# Altium PCB Transmitter_PCB_v1.0.PcbDoc
Units mil, origin at the board's own origin, x right, y up, seen from the top; angles counter-clockwise.
Board outline 1225 x 1773.54 mil, 2 copper layers (Top Layer, Bottom Layer), stack 57 mil thick; 26 components, 18 nets, 66 pads, 142 vias.
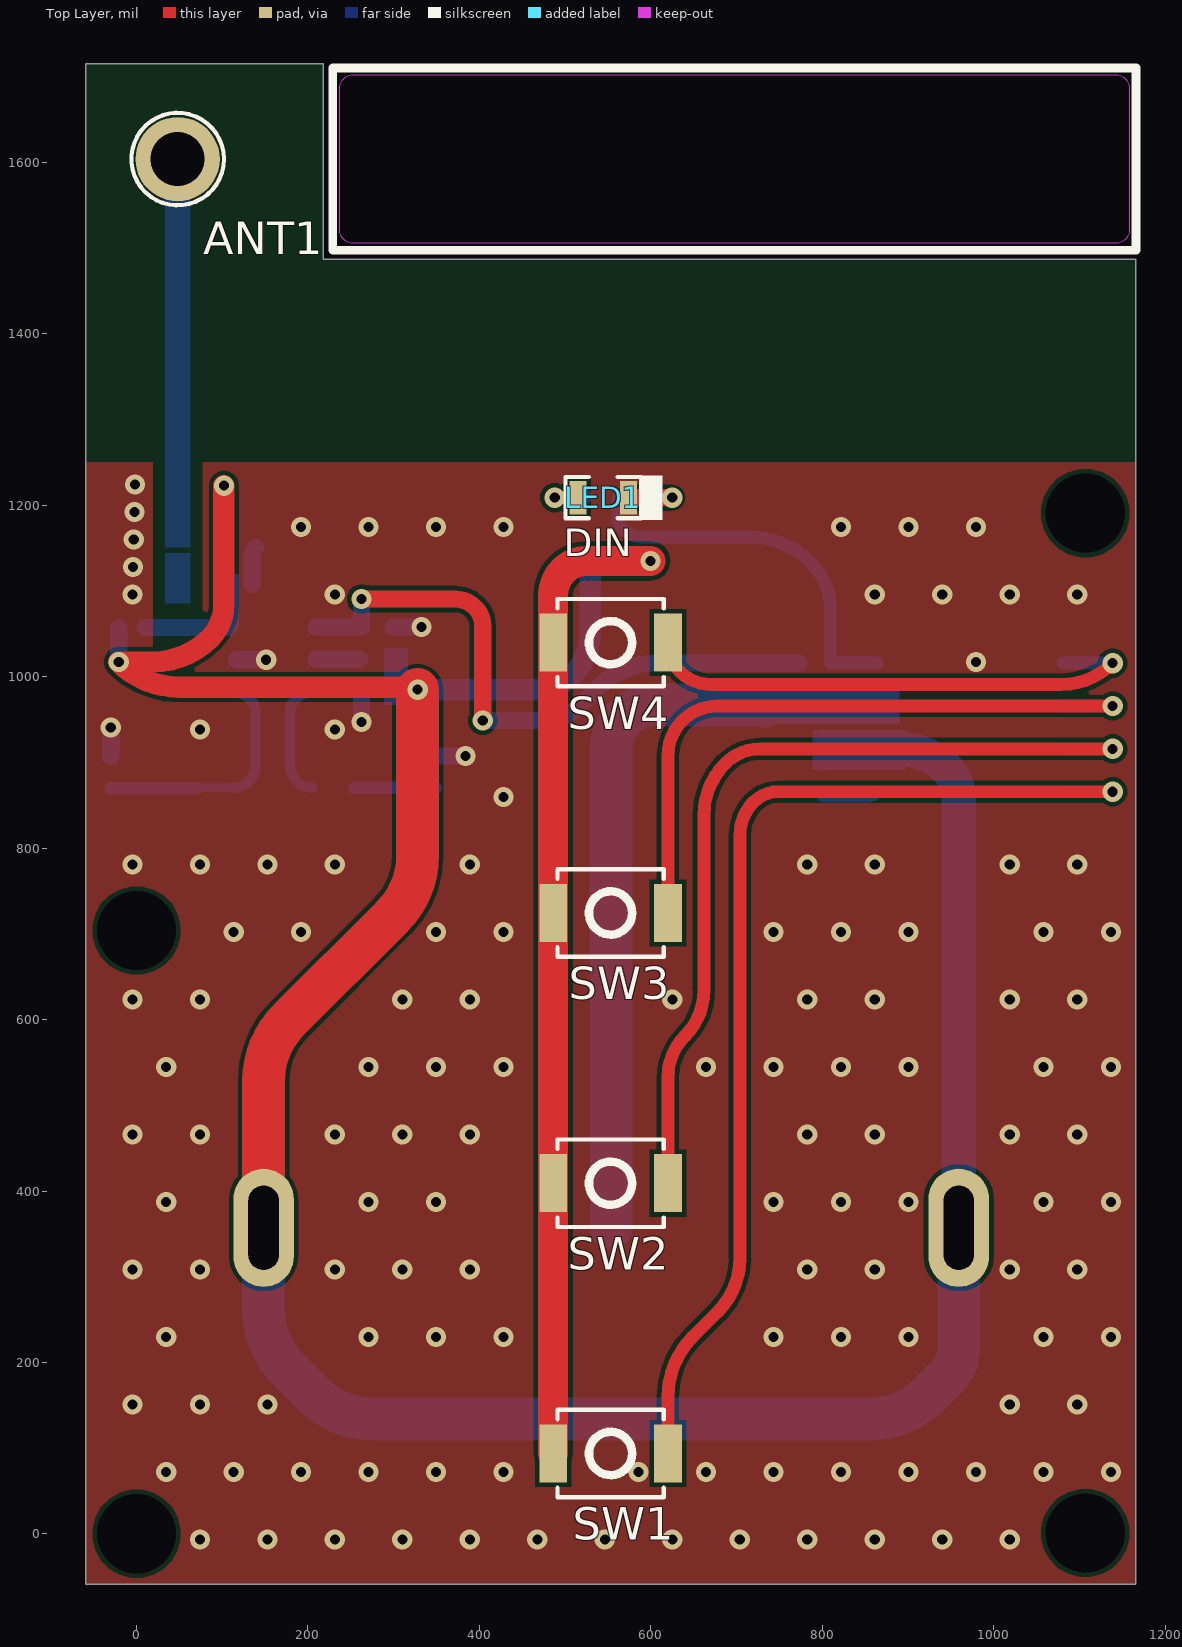
[diagram p0: Top Layer view]
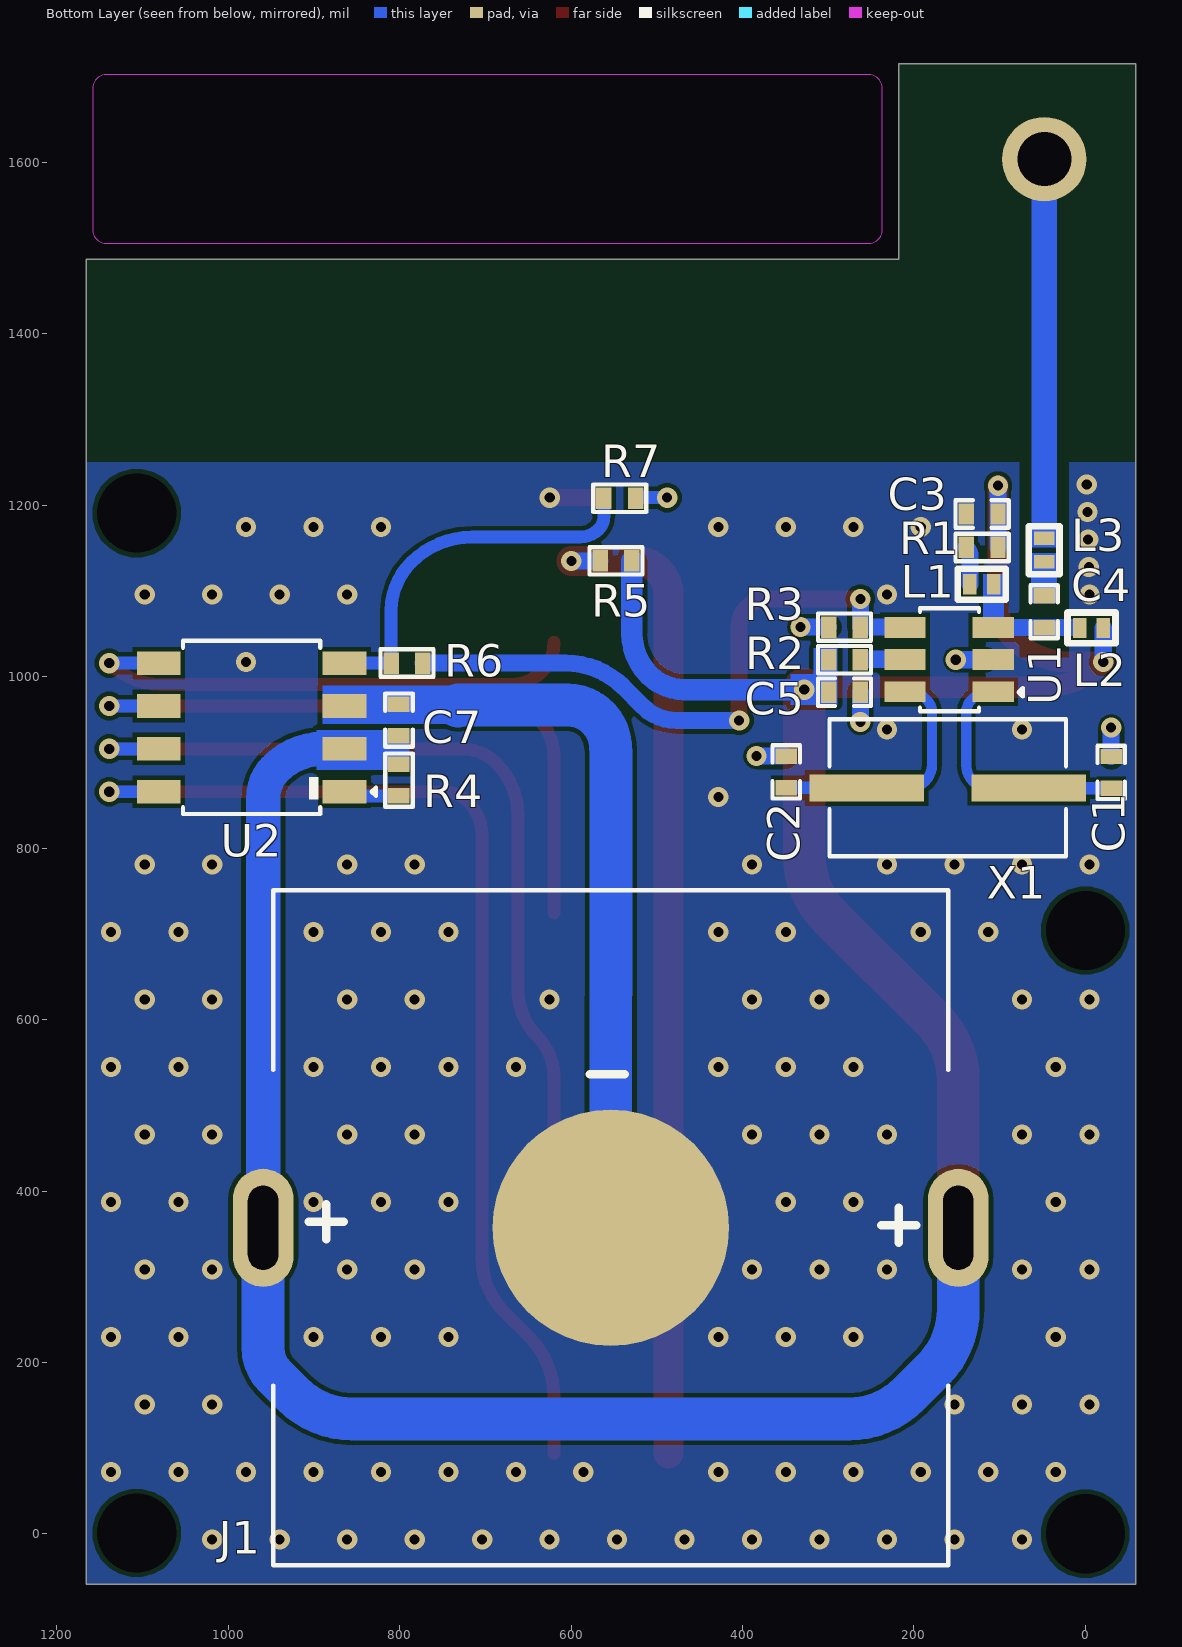
[diagram p1: Bottom Layer view, seen from below]
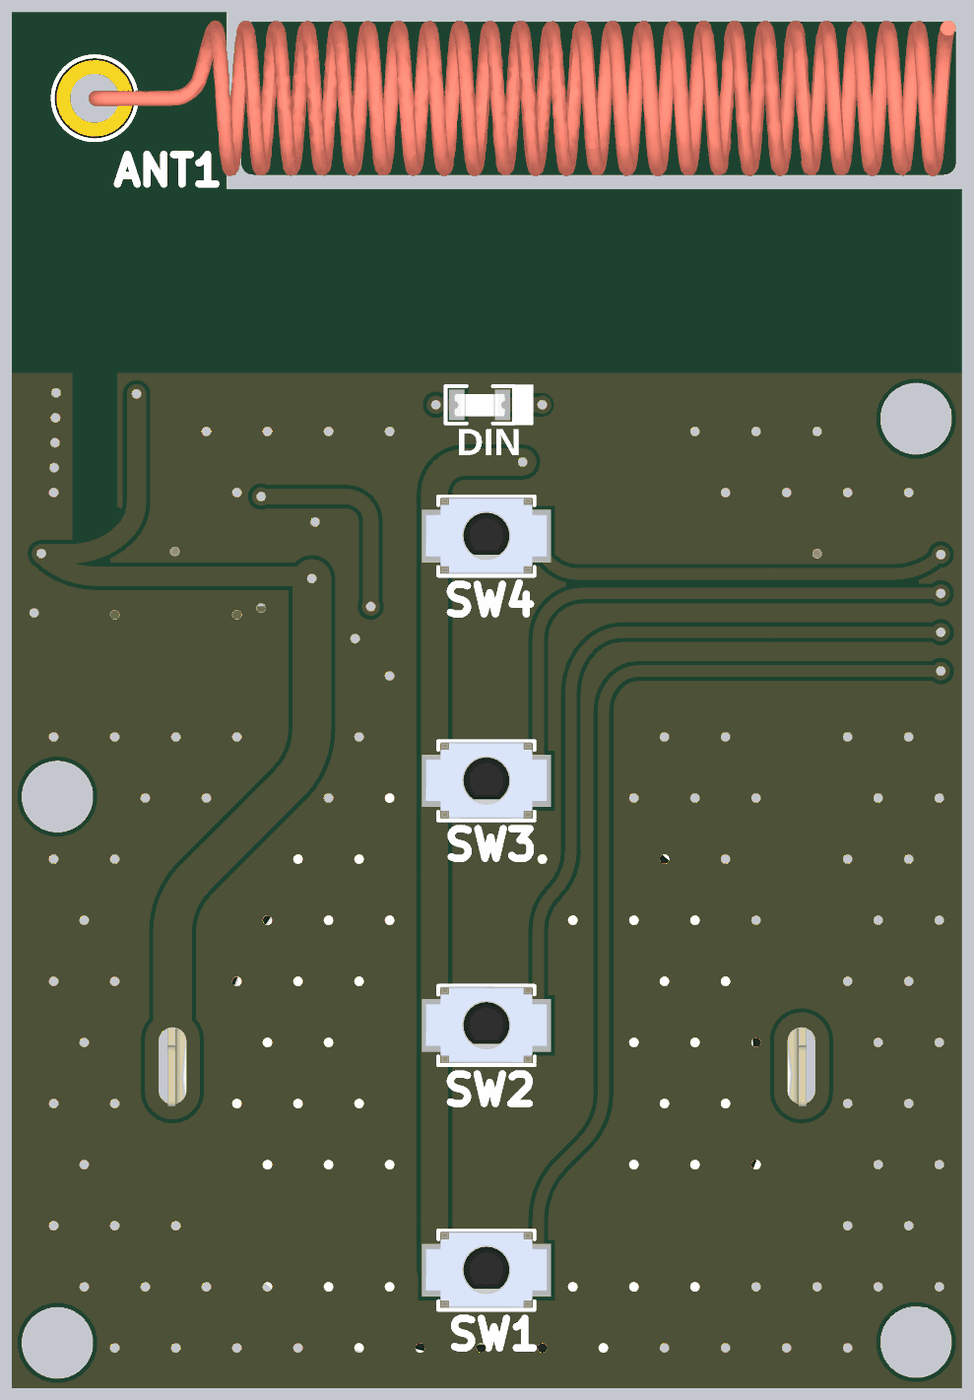
[diagram p2: 3D render of the assembled board from above, using the file's embedded part models]
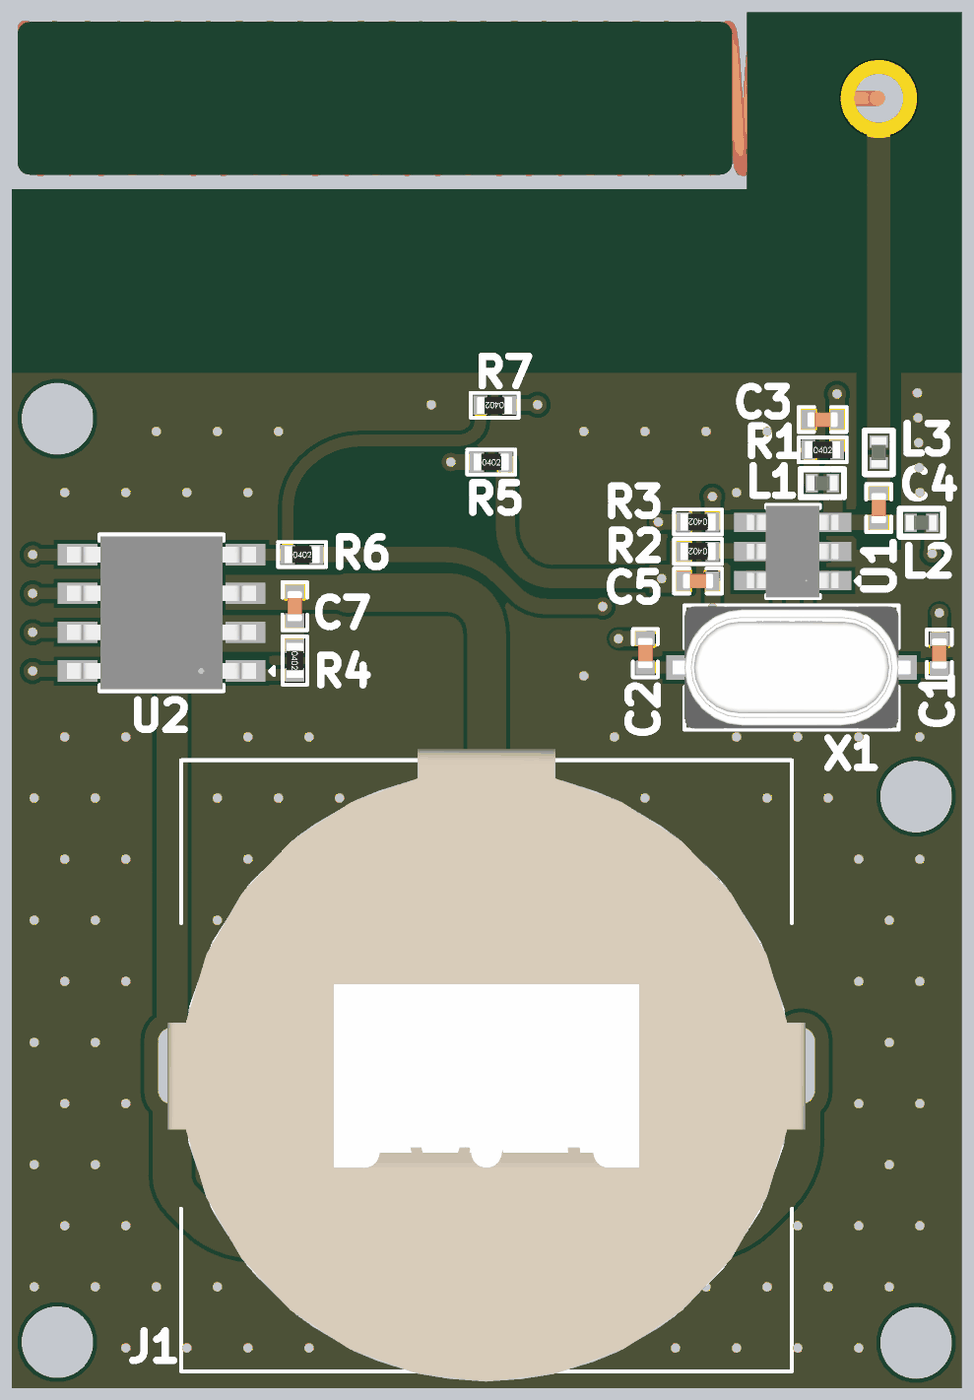
[diagram p3: 3D render of the assembled board from below, using the file's embedded part models]

## Layer stack, top to bottom
Top Solder: solder mask 3, Solder Resist, Dk 3.5
Top Layer: signal copper 10
Dielectric 1: core 37, FR-4, Dk 4.8
Bottom Layer: signal copper 10
Bottom Solder: solder mask 3, Solder Resist, Dk 3.5

## Board outline
-59,-58.54 -59,1715 218,1715 218,1487 1166,1487 1166,1486.73 1166,-58.54

## Design rules (kind name [scope] priority, off if disabled: settings)
Clearance [All] p1: gap=5 ignorepadtopadclearanceinfootprint=FALSE
HoleSize [All] p1: absolutevalues=TRUE maxlimit=1000 minlimit=1 maxpercent=80.000 minpercent=20.000
HoleToHoleClearance [All] p1: gap=0 allowstackedmicrovias=TRUE
MinimumSolderMaskSliver [All] p1: minsoldermaskwidth=0
PolygonConnect [All] p1: connectstyle=Direct reliefconductorwidth=10 reliefentries=4 polygonreliefangle="90 Angle" airgapwidth=10
RoutingVias [All] p1: holewidth=11.81 width=23.62 viastyle="Through Hole" minholewidth=11.81 minwidth=23.62 maxholewidth=11.81 maxwidth=23.62
SilkToSilkClearance [All] p1: silktosilkclearance=0
SilkToSolderMaskClearance [IsPad] p1: minsilkscreentomaskgap=0 clearancetoexposedcopper=TRUE
SolderMaskExpansion [All] p1: expansion=4 istentingtop=TRUE soldermaskfromhole=TRUE
Width [All] p1: maxlimit=100 minlimit=10 preferedwidth=15 minimp=50.000000 maximp=50.000000 favimp=50.000000
25 further rules are at their usual default settings.

## Components (designator, comment, footprint, x,y, rotation, side; value= is the part's Value field where it differs from the comment)
ANT1 "T14-433M" T14-433M 48,1604 r90 top locked
C1 "18pF" Cap-0402 -30,888.5 r90 bottom locked
C2 "18pF" Cap-0402 349,889 r90 bottom locked
C3 "1uF" Cap-0402 120.47,1189.94 r180 bottom locked
C4 "12pF" Cap-0402 48.13,1075.87 r270 bottom locked
C5 "2.2uf" Cap-0402 281.07,981.93 r0 bottom locked
C7 "100pF" Cap-0402 800.91,949.5 r270 bottom locked
J1 "MY-2032-02" MY-2032-02 553.82,357.13 r180 bottom locked
L1 "180nH" IND-0402 120.97,1107.94 r0 bottom locked
L2 "120nH" IND-0402 -7,1057 r180 bottom locked
L3 "56nH" IND-0402 48.13,1147.7 r270 bottom locked
LED1 "RED" LED-0603 544.47,1209 r0 top locked
R1 "0R" Res-0402 120.47,1150.94 r180 bottom locked
R2 "0R" Res-0402 281.07,1019.93 r0 bottom locked
R3 "DNP" Res-0402 281.07,1057.93 r0 bottom locked
R4 "300K" Res-0402 800.91,879.5 r270 bottom locked
R5 "1K" Res-0402 547.71,1135.21 r180 bottom locked
R6 "10K" Res-0402 791.5,1016 r180 bottom locked
R7 "3.3K" Res-0402 543.29,1208.33 r0 bottom locked
SW1 "B3U-1000P" B3U-1000P 553.07,93.79 r180 top locked
SW2 "B3U-1000P" B3U-1000P 553.07,409.12 r180 top locked
SW3 "B3U-1000P" B3U-1000P 553.07,724.45 r180 top locked
SW4 "B3U-1000P" B3U-1000P 553.07,1039.78 r180 top locked
U1 "WF4455TD AS6T LG" SOT-23-6 159.07,1019.93 r0 bottom locked
U2 "L1527" SOP-8 972.89,940.9 r0 bottom locked
X1 "13.56MHz" HC-49S-SMD-2P-Mini 160.54,870.45 r0 bottom locked

## Footprints (in the part's own frame and the unit in brackets; to place one, negate y for a bottom-side part, rotate by r counter-clockwise, add the part's x,y. Pads: shape width x height; smd on the part's side, far side on the other; paste and mask are expansions set on the pad)
B3U-1000P [mm] "SWITCH TACTILE SPST-NO 0.05A 12V"
  rect 0.82x1.72 smd: 1(-1.7,0) 2(1.7,0)
  silkscreen extent -1.57,-1.3 1.57,1.3, body extent -2,-1.26 2,1.24, height 1.6
Cap-0402 [mil]
  rect 18x25 smd mask+2.36: 1(-18.5,0) 2(18.5,0)
  silkscreen extent -31,-16 31,16, body extent -20,-10 20,10, height 19
HC-49S-SMD-2P-Mini [mm]
  rect 3.4x0.8 smd: 1(-2.4,0) 2(2.4,0)
  silkscreen extent -3.51,-2.03 3.51,2.03, body extent -3.9,-2 3.9,2, height 2.35
IND-0402 [mm]
  rect 0.4x0.6 smd: 1(-0.35,0) 2(0.35,0)
  silkscreen extent -0.71,-0.46 0.71,0.46, body extent -0.5,-0.25 0.5,0.25, height 0.25
LED-0603 [mm]
  rect 0.5x1 smd: 1(-0.75,0) 2(0.75,0)
  silkscreen extent -1.12,-0.66 1.75,0.66, body extent -0.82,-0.37 0.82,0.36, height 0.68
MY-2032-02 [mm]
  oval 1.8x3.5 hole 0.9 slot 2.5 at 90 deg: 1(-10.3,0) 1(10.3,0)
  round 7 smd: 2(0,0)
  silkscreen extent -10,-10 10,10, body extent -10.45,-10.34 10.45,10.36, height 4.14
Res-0402 [mil]
  rect 18x25 smd mask+2.17: 1(-18.5,0) 2(18.5,0)
  silkscreen extent -32,-17 32,16, body extent -23,-11 23,11, height 16
SOP-8 [mm]
  rect 1.3x0.7 smd: 1(-2.75,1.905) 2(-2.75,0.635) 3(-2.75,-0.635) 4(-2.75,-1.905) 5(2.75,-1.905) 6(2.75,-0.635) 7(2.75,0.635) 8(2.75,1.905)
  silkscreen extent -3.69,-2.57 2.03,2.57, body extent -3.1,-2.5 3.1,2.5, height 1.76
SOT-23-6 [mm]
  rect 1.22x0.62 smd: 1(-1.31,0.95) 2(-1.31,0) 3(-1.31,-0.95) 4(1.31,-0.95) 5(1.31,0) 6(1.31,0.95)
  silkscreen extent -2.18,-1.52 0.86,1.52, body extent -1.5,-1.5 1.5,1.5, height 1.47
T14-433M [mm]
  round 2.5 hole 1.6 paste+0 mask+0.051: 1(0,0)
  Keep-Out Layer board cut-out: -2.1,-4.8 2.1,-4.8 2.253,-4.83 2.383,-4.917 2.47,-5.047 2.5,-5.2 2.5,-5.2 2.5,-27.8 2.47,-27.953 2.383,-28.083 2.253,-28.169 2.1,-28.2 2.1,-28.2 -2.1,-28.2 -2.253,-28.169 -2.383,-28.083 -2.47,-27.953 -2.5,-27.8 -2.5,-27.8 -2.5,-5.2 -2.47,-5.047 -2.383,-4.917 -2.253,-4.83 -2.1,-4.8
  silkscreen extent -2.7,-28.4 2.7,1.37, body extent -2.55,-28.2 2.55,0.2, height 6.65

## Part data
ANT1: "433MHz helical Antennas ROHS", LCSC Part Number=C381188, Manufacturer=DreamLNK, ComponentLink1Description=LCSC, ComponentLink1URL=https://www.lcsc.com/product-detail/Antennas_DreamLNK-T14-433M_C381188.html, Item Type=Antenna, Manufacturer Part Number=T14-433M
C1 C2: library part GCM1555C1H180GA16D, "CAP CER 18PF 50V C0G/NP0 0402", Case Code (Imperial)=0402, Case Code (Metric)=1005, LCSC Part Number=C882583, Manufacturer=Murata, Max Operating Temperature=125°C, Min Operating Temperature=-55°C, Ratings=AEC-Q200, Supplier Part Number=2477793P, Tolerance=2%, Voltage Rating=50V, Case/Package=0402, Category="Ceramic Capacitors", ComponentLink1Description=http://search.murata.co.jp/Ceramy/image/img/A01X/G101/ENG/GCM1555C1H180GA16-01.pdf?src-supplier=Digi-Key, ComponentLink1URL=http://search.murata.co.jp/Ceramy/image/img/A01X/G101/ENG/GCM1555C1H180GA16-01.pdf?src-supplier=Digi-Key, ComponentLink2Description=https://search.murata.co.jp/Ceramy/image/img/A01X/G101/ENG/GCM1555C1H180GA16-01.pdf?src-supplier=Digi-Key, ComponentLink2URL=https://search.murata.co.jp/Ceramy/image/img/A01X/G101/ENG/GCM1555C1H180GA16-01.pdf?src-supplier=Digi-Key, ComponentLink3Description=https://datasheet.octopart.com/GCM1555C1H180GA16D-Murata-datasheet-149522315.pdf?src-supplier=Newark, ComponentLink3URL=https://datasheet.octopart.com/GCM1555C1H180GA16D-Murata-datasheet-149522315.pdf?src-supplier=Newark, ComponentLink4Description=https://datasheet.octopart.com/GCM1555C1H180GA16D-Murata-datasheet-12511495.pdf?src-supplier=TME, ComponentLink4URL=https://datasheet.octopart.com/GCM1555C1H180GA16D-Murata-datasheet-12511495.pdf?src-supplier=TME, Item Type=Capacitor, Manufacturer Part Number=GCM1555C1H180GA16D, Mounting Technology="Surface Mount", Packaging="Cut Tape", Pricing="500=0.013, 5000=0.009 (GBP)", RoHS=Yes, RoHS Compliant=Yes, Series=GCM, Stock=10000, Supplier=Rs
C3: library part CC0402KRX5R8BB105, "CAP CER 1UF 25V X5R 0402", Case Code (Imperial)=0402, Case Code (Metric)=1005, Dielectric=X5R, LCSC Part Number=C326568, Manufacturer=Yageo, Max Operating Temperature=85°C, Min Operating Temperature=-55°C, Package Quantity=10000, Supplier Part Number 1=603-CC402KRX5R8BB105, Tolerance=10%, Voltage Rating=25V, Capacitance=1uF, Case/Package=0402, Category="Ceramic Capacitors", ComponentLink1Description=http://www.mouser.com/ds/2/447/Yageo_UPY-GP_NP0_16V-to-50V_9-358835.pdf?src-supplier=Mouser, ComponentLink1URL=http://www.mouser.com/ds/2/447/Yageo_UPY-GP_NP0_16V-to-50V_9-358835.pdf?src-supplier=Mouser, ComponentLink2Description=http://www.yageo.com/documents/recent/UPY-GPHC_X5R_4V-to-50V_25.pdf?src-supplier=Digi-Key, ComponentLink2URL=http://www.yageo.com/documents/recent/UPY-GPHC_X5R_4V-to-50V_25.pdf?src-supplier=Digi-Key, ComponentLink3Description=https://4donline.ihs.com/images/VipMasterIC/IC/YAGO/YAGO-S-A0006851646/YAGO-S-A0006851646-1.pdf?hkey=6D3A4C79FDBF58556ACFDE234799DDF0&src-supplier=Newark, ComponentLink3URL=https://4donline.ihs.com/images/VipMasterIC/IC/YAGO/YAGO-S-A0006851646/YAGO-S-A0006851646-1.pdf?hkey=6D3A4C79FDBF58556ACFDE234799DDF0&src-supplier=Newark, Halogen Free="Halogen Free", Lead Free="Lead Free", Length=0.039inch, Manufacturer Part Number=CC0402KRX5R8BB105, Mount="Surface Mount", Packaging="Tape and Reel", Pricing 1="1=0.30000, 10=0.20400, 50=0.20400, 100=0.11600, 1000=0.07200, 10000=0.05900 (USD)", RoHS=Yes, RoHS Compliant=Yes, Stock 1=91975, Supplier 1=Mouser, Termination=SMD/SMT, Thickness=0.022inch, Voltage Rating (DC)=25V, Weight=2.3E-05oz, Width=0.02inch
C4: library part GJM1555C1H120GB01D, "CAP CER 12PF 50V C0G/NP0 0402", Case Code (Imperial)=0402, Case Code (Metric)=1005, Dielectric=C0G, LCSC Part Number=C161305, Manufacturer=Murata, Max Operating Temperature=125°C, Min Operating Temperature=-55°C, Package Quantity=10000, Supplier Part Number 1=490-8078-1-ND, Tolerance=2%, Voltage Rating=50V, Capacitance=12pF, Case/Package=0402, Category="Ceramic Capacitors", ComponentLink1Description=https://datasheet.ciiva.com/11608/product-11608208.pdf?src-supplier=Avnet, ComponentLink1URL=https://datasheet.ciiva.com/11608/product-11608208.pdf?src-supplier=Avnet, ComponentLink2Description=https://datasheet.ciiva.com/29542/partnumbering-e-01-29542716.pdf?src-supplier=Digi-Key, ComponentLink2URL=https://datasheet.ciiva.com/29542/partnumbering-e-01-29542716.pdf?src-supplier=Digi-Key, ComponentLink3Description=https://datasheet.ciiva.com/29542/partnumbering-e-01-29542715.pdf?src-supplier=Digi-Key, ComponentLink3URL=https://datasheet.ciiva.com/29542/partnumbering-e-01-29542715.pdf?src-supplier=Digi-Key, ComponentLink4Description=https://datasheet.ciiva.com/29542/partnumbering-e-01-29542717.pdf?src-supplier=Digi-Key, ComponentLink4URL=https://datasheet.ciiva.com/29542/partnumbering-e-01-29542717.pdf?src-supplier=Digi-Key, Construction=Flat, Depth=0.5mm, Height=0.5mm, Lead Free="Lead Free", Length=1mm, Manufacturer Part Number=GJM1555C1H120GB01D, Mount="Surface Mount", Packaging="Tape and Reel", Pricing 1="1=0.18000, 10=0.12600, 50=0.07560, 100=0.06390, 500=0.04370, 1000=0.03865, 2500=0.03698, 5000=0.03361 (USD)", Radiation Hardening=No, RoHS=Yes, RoHS Compliant=Yes, Series=GJM, Stock 1=266975, Supplier 1=Digi-Key, Termination=SMD/SMT, Thickness=0.022inch, Voltage Rating (DC)=50V, Width=0.5mm
C5: library part GRM155R61E225KE11D, "CAP CER 2.2UF 25V X5R 0402", Capacitance=2.2uF, Case Code (Imperial)=0402, Case Code (Metric)=1005, Dielectric=X5R, LCSC Part Number=C385032, Manufacturer=Murata, Max Operating Temperature=85°C, Min Operating Temperature=-55°C, Package Quantity=10000, Resistor Type=Ceramic, Tolerance=10%, Voltage Rating=25V, Case/Package=0402, Category="Ceramic Capacitors", ComponentLink1Description=http://www.mouser.com/ds/2/281/c02e-2905.pdf?src-supplier=Mouser, ComponentLink1URL=http://www.mouser.com/ds/2/281/c02e-2905.pdf?src-supplier=Mouser, ComponentLink2Description=http://search.murata.co.jp/Ceramy/image/img/A01X/G101/ENG/GRM155R61E225KE11-01.pdf?src-supplier=Digi-Key, ComponentLink2URL=http://search.murata.co.jp/Ceramy/image/img/A01X/G101/ENG/GRM155R61E225KE11-01.pdf?src-supplier=Digi-Key, ComponentLink3Description=http://search.murata.co.jp/Ceramy/image/img/A01X/partnumbering_e_01.pdf?src-supplier=Digi-Key, ComponentLink3URL=http://search.murata.co.jp/Ceramy/image/img/A01X/partnumbering_e_01.pdf?src-supplier=Digi-Key, ComponentLink4Description=http://psearch.en.murata.com/capacitor/product/GRM155R61E225KE11%23.pdf?src-supplier=Avnet, ComponentLink4URL=http://psearch.en.murata.com/capacitor/product/GRM155R61E225KE11%23.pdf?src-supplier=Avnet, Height=0.5mm, Item Type=Capacitor, Lead Free="Lead Free", Length=1mm, Manufacturer Part Number=GRM155R61E225KE11D, Material=Ceramic, Mount="Surface Mount", Packaging="Tape and Reel", Pricing 1="10000=0.03830, 20000=0.03623, 40000=0.03416, 60000=0.03209, 80000=0.03002, 100000=0.02795, 1000000=0.02588 (USD)", RoHS=Yes, RoHS Compliant=Yes, Stock 1=210000, Supplier 1=Avnet, Supplier Part Number 1=GRM155R61E225KE11D, Termination=SMD/SMT, Thickness=0.022inch, Voltage Rating (DC)=25V, Weight=0.000212oz, Width=0.5mm
C7: library part CC0402JRNPO9BN101, "CAP CER 100PF 50V C0G/NPO 0402", Case Code (Imperial)=0402, Case Code (Metric)=1005, Dielectric=C0G, Dielectric Material=Ceramic, Insulation Resistance=100GR, LCSC Part Number=C106200, Manufacturer=Yageo, Max Operating Temperature=125°C, Min Operating Temperature=-55°C, Package Quantity=1, Supplier Part Number=8934564, Temperature Coefficient=30ppm/°C, Tolerance=5%, Voltage=50V, Case/Package=0402, Category="Ceramic Capacitors", ComponentLink1Description=https://datasheet.ciiva.com/11786/0900766b80d84fbf-11786101.pdf?src-supplier=Rs, ComponentLink1URL=https://datasheet.ciiva.com/11786/0900766b80d84fbf-11786101.pdf?src-supplier=Rs, ComponentLink2Description=https://datasheet.ciiva.com/23767/25787-23767888.pdf?src-supplier=Newark, ComponentLink2URL=https://datasheet.ciiva.com/23767/25787-23767888.pdf?src-supplier=Newark, ComponentLink3Description=https://datasheet.ciiva.com/28450/1443161-28450220.pdf?src-supplier=Element14, ComponentLink3URL=https://datasheet.ciiva.com/28450/1443161-28450220.pdf?src-supplier=Element14, ComponentLink4Description=https://datasheet.ciiva.com/8033/1443161-8033598.pdf?src-supplier=Element14, ComponentLink4URL=https://datasheet.ciiva.com/8033/1443161-8033598.pdf?src-supplier=Element14, ComponentLink5Description=https://datasheet.ciiva.com/143/mlccorderingcode-143990.pdf?src-supplier=Digi-Key, ComponentLink5URL=https://datasheet.ciiva.com/143/mlccorderingcode-143990.pdf?src-supplier=Digi-Key, ComponentLink6Description=https://datasheet.ciiva.com/143/mlccorderingcode-143989.pdf?src-supplier=Digi-Key, ComponentLink6URL=https://datasheet.ciiva.com/143/mlccorderingcode-143989.pdf?src-supplier=Digi-Key, ComponentLink7Description=https://datasheet.ciiva.com/143/mlccorderingcode-143991.pdf?src-supplier=Digi-Key, ComponentLink7URL=https://datasheet.ciiva.com/143/mlccorderingcode-143991.pdf?src-supplier=Digi-Key, Depth=0.5mm, Height=0.5mm, Item Type=Capacitor, Lead Free="Lead Free", Length=1mm, Manufacturer Part Number=CC0402JRNPO9BN101, Mounting Technology="Surface Mount", Packaging="Tape and Reel", Pins=2, Pricing="10000=0.002, 40000=0.0019, 150000=0.0018, 400000=0.0018, 1000000=0.0017 (USD)", Radiation Hardening=No, Reach SVHC Compliant=No, RoHS=Yes, RoHS Compliant=Yes, Series=CC, Stock=11720000, Supplier="Future Electronics", Termination=SMD/SMT, Thickness=0.022inch, Voltage Rating=50V, Voltage Rating (DC)=50V, Width=0.02inch
J1: "Battery button CR2032 Plugin Battery Connectors ROHS", LCSC Part Number=C964822, Manufacturer=MYOUNG, Package=Plugin, ComponentLink1Description=LCSC, ComponentLink1URL=https://www.lcsc.com/product-detail/Battery-Connectors_MYOUNG-MY-2032-02_C964822.html, Item Type="Battery Connector", Manufacturer Part Number=MY-2032-02
L1: library part LQG15HSR18J02D, "FIXED IND 180NH 150MA 3.38OHM SM", Case Code (Imperial)=0402, Case Code (Metric)=1005, Current Rating=130mA, DC Resistance (DCR)=3.38R, LCSC Part Number=C185484, Manufacturer=Murata, Max Operating Temperature=125°C, Min Operating Temperature=-55°C, Package Quantity=1, Self Resonant Frequency=500MHz, Supplier Part Number=6065630, Test Frequency=100MHz, Tolerance=5%, Case/Package=0402, Category="Fixed Inductors", ComponentLink1Description=https://datasheet.ciiva.com/11799/0900766b8090d458-11799084.pdf?src-supplier=Rs, ComponentLink1URL=https://datasheet.ciiva.com/11799/0900766b8090d458-11799084.pdf?src-supplier=Rs, ComponentLink2Description=https://datasheet.ciiva.com/4976/o05e-4976364.pdf?src-supplier=Mouser, ComponentLink2URL=https://datasheet.ciiva.com/4976/o05e-4976364.pdf?src-supplier=Mouser, ComponentLink3Description=https://datasheet.ciiva.com/16456/l0075s0083lqg15hs-16456253.pdf?src-supplier=Future+Electronics, ComponentLink3URL=https://datasheet.ciiva.com/16456/l0075s0083lqg15hs-16456253.pdf?src-supplier=Future+Electronics, ComponentLink4Description=https://datasheet.ciiva.com/6690/l0075s0083lqg15hs-6690743.pdf?src-supplier=Digi-Key, ComponentLink4URL=https://datasheet.ciiva.com/6690/l0075s0083lqg15hs-6690743.pdf?src-supplier=Digi-Key, ComponentLink5Description=https://datasheet.ciiva.com/6690/l0075s0083lqg15hs-6690745.pdf?src-supplier=Digi-Key, ComponentLink5URL=https://datasheet.ciiva.com/6690/l0075s0083lqg15hs-6690745.pdf?src-supplier=Digi-Key, ComponentLink6Description=https://datasheet.ciiva.com/6690/l0075s0083lqg15hs-6690746.pdf?src-supplier=Digi-Key, ComponentLink6URL=https://datasheet.ciiva.com/6690/l0075s0083lqg15hs-6690746.pdf?src-supplier=Digi-Key, Core Material=Air, DC Current=130mA, Depth=0.55mm, Height=0.5mm, Height - Seated (Max)=0.022inch, Item Type=Inductor, Lead Free="Lead Free", Length=1mm, Manufacturer Part Number=LQG15HSR18J02D, Max Current Rating=130mA, Max DC Current=130mA, Military Standard=Not, Mounting Technology="Surface Mount", Packaging="Tape and Reel", Pricing="10000=0.0094, 30000=0.0091, 50000=0.0089, 150000=0.0086, 250000=0.0083 (USD)", Q Factor=8, RoHS=Yes, RoHS Compliant=Yes, Series=LQG15HS, Shielding=Unshielded, Stock=20000, Supplier="Future Electronics", Termination=SMD/SMT, Width=0.02inch
L2: library part FHW0402UCR12JST, "30mA 120nH ±5% 2.2Ω 0402 Inductors (SMD) ROHS", LCSC Part Number=C317977, Manufacturer=FH, Package=0402, ComponentLink1Description=LCSC, ComponentLink1URL=https://www.lcsc.com/product-detail/Inductors-SMD_KOHERelec-MDA1040-470M_C2847557.html, Item Type=Inductor, Manufacturer Part Number=FHW0402UCR12JST
L3: library part AHW1005C-56NJTF, "100mA 56nH ±5% 0.97Ω 0402 Inductors (SMD) ROHS", LCSC Part Number=C6807990, Manufacturer=APV, Package=0402, ComponentLink1Description=LCSC, ComponentLink1URL=https://www.lcsc.com/product-detail/Inductors-SMD_APV-AHW1005C-56NJTF_C6807990.html, Item Type=Inductor, Manufacturer Part Number=AHW1005C-56NJTF
LED1: library part NCD0603R3, "RED LED 0603 Light Emitting Diodes", LCSC Part Number=C3151730, Manufacturer="Foshan NationStar Optoelectronics", Package=0603, ComponentLink1Description=LCSC, ComponentLink1URL=https://www.lcsc.com/product-detail/Light-Emitting-Diodes-LED_Foshan-NationStar-Optoelectronics-NCD0603R3_C3151730.html, Item Type=LED, Manufacturer Part Number=NCD0603R3
R1 R2: library part AC0402FR-070RL, "Zero Ohm Resistor, Jumper, 0402 [1005 Metric], Thick Film, 63 mW, 1 A, Surface Mount", Case Code (Imperial)=0402, Case Code (Metric)=1005, LCSC Part no=C226739, Manufacturer=Yageo, Max Operating Temperature=155°C, Min Operating Temperature=-55°C, Power Rating=62.5mW, Supplier Part Number=13-AC0402FR-070RLDKR-ND, Temperature Coefficient=200ppm/°C, Tolerance=1%, Voltage Rating=50V, Case/Package=0402, Category="Chip SMD Resistors", ComponentLink1Description=https://datasheet.ciiva.com/12656/pyu-ac-51-rohs-l-2-12656734.pdf?src-supplier=Mouser, ComponentLink1URL=https://datasheet.ciiva.com/12656/pyu-ac-51-rohs-l-2-12656734.pdf?src-supplier=Mouser, ComponentLink2Description=LCSC, ComponentLink2URL=https://www.lcsc.com/product-detail/Chip-Resistor-Surface-Mount_YAGEO-AC0402FR-070RL_C226739.html, Height=370um, Item Type=Resistor, Manufacturer Part Number=AC0402FR-070RL, Packaging="Tape and Reel", Pricing="1=0.1, 10=0.017, 25=0.0132, 50=0.01, 100=0.0071, 250=0.00568, 500=0.00454, 1000=0.00335, 5000=0.0024 (USD)", RoHS=Yes, Series=AC, Stock=337140, Supplier=Digi-Key, Termination=SMD/SMT
R3: library part RC0402FR-07100KL, "RES 100K OHM 1% 1/16W 0402", Case Code (Imperial)=0402, Case Code (Metric)=1005, LCSC Part Number=C60491, Manufacturer=Yageo, Max Operating Temperature=155°C, Max Power Dissipation=63mW, Min Operating Temperature=-55°C, Package Quantity=1, Resistance=100kR, Resistance Tolerance=1%, Resistor Type="Thick Film", Supplier Part Number 1=603-RC0402FR-07100KL, Temperature Coefficient=100ppm/°C, Voltage Rating=50V, Case/Package=0402, Category="Chip SMD Resistors", ComponentLink1Description=https://datasheet.ciiva.com/11819/0900766b80c66297-11819452.pdf?src-supplier=RSComponents, ComponentLink1URL=https://datasheet.ciiva.com/11819/0900766b80c66297-11819452.pdf?src-supplier=RSComponents, ComponentLink2Description=https://datasheet.ciiva.com/22747/1018594-22747509.pdf?src-supplier=Element14, ComponentLink2URL=https://datasheet.ciiva.com/22747/1018594-22747509.pdf?src-supplier=Element14, ComponentLink3Description=https://datasheet.ciiva.com/2453/pyu-r-int-thick-7-2453362.pdf?src-supplier=Digi-Key, ComponentLink3URL=https://datasheet.ciiva.com/2453/pyu-r-int-thick-7-2453362.pdf?src-supplier=Digi-Key, ComponentLink4Description=https://datasheet.ciiva.com/2453/pyu-r-int-thick-7-2453363.pdf?src-supplier=Digi-Key, ComponentLink4URL=https://datasheet.ciiva.com/2453/pyu-r-int-thick-7-2453363.pdf?src-supplier=Digi-Key, ComponentLink5Description=https://datasheet.ciiva.com/2453/pyu-r-int-thick-7-2453361.pdf?src-supplier=Digi-Key, ComponentLink5URL=https://datasheet.ciiva.com/2453/pyu-r-int-thick-7-2453361.pdf?src-supplier=Digi-Key, ComponentLink6Description=https://datasheet.ciiva.com/12667/pyu-rc0402-51-rohs-l-6-r-12667930.pdf?src-supplier=Mouser, ComponentLink6URL=https://datasheet.ciiva.com/12667/pyu-rc0402-51-rohs-l-6-r-12667930.pdf?src-supplier=Mouser, ComponentLink7Description=https://datasheet.ciiva.com/15189/getdatasheetpartid-323696-15189334.pdf?src-supplier=Verical, ComponentLink7URL=https://datasheet.ciiva.com/15189/getdatasheetpartid-323696-15189334.pdf?src-supplier=Verical, Construction=Rectangular, Depth=0.5mm, Features="Moisture Resistant", Height=0.016inch, Item Type=Resistor, Lead Free="Lead Free", Length=0.039inch, Manufacturer Part Number=RC0402FR-07100KL, Military Standard=Not, Number of Terminations=2, Packaging="Tape and Reel", Power Rating=63mW, Pricing 1="1=0.10000, 10=0.01200, 50=0.01200, 100=0.00500, 1000=0.00300, 2500=0.00200, 10000=0.00100 (USD)", REACH SVHC="No SVHC", RoHS=Yes, RoHS Compliant=Yes, Series=RC, Stock 1=7759549, Supplier 1=Mouser, Technology="THICK FILM", Termination=SMD/SMT, Tolerance=1%, Width=0.02inch, Working Voltage=50V
R4: library part RCS0402300KFKED, "RES SMD 300K OHM 1% 1/5W 0402", Case/Package=0402, LCSC Part Number=C1881124, Manufacturer="Vishay Dale", Max Operating Temperature=155°C, Max Power Dissipation=200mW, Min Operating Temperature=-55°C, Package Quantity=10000, Resistance=300kR, Resistor Type="Thick Film", Supplier Part Number 1=541-RCS0402300KFKEDDKR-ND, Temperature Coefficient=100ppm/°C, Tolerance=1%, ComponentLink1Description=http://www.vishay.com/docs/20065/rcse3.pdf?src-supplier=Digi-Key, ComponentLink1URL=http://www.vishay.com/docs/20065/rcse3.pdf?src-supplier=Digi-Key, Features="Automotive AEC-Q200", Height=0.016inch, Length=0.039inch, Manufacturer Part Number=RCS0402300KFKED, Number of Terminations=2, Packaging="Tape and Reel", Pricing 1="1=0.12, 10=0.105, 100=0.0402, 1000=0.01771, 2500=0.0153, 5000=0.01368 (USD)", RoHS Compliant=Yes, Stock 1=9042, Supplier 1=Digi-Key, Width=0.02inch
R5: library part CRCW04021K00FKEDHP, "RES SMD 1K OHM 1% 1/5W 0402", Case Code (Imperial)=0402, Case Code (Metric)=1005, LCSC Part Number=C313354, Manufacturer="Vishay Dale", Max Operating Temperature=155°C, Max Power Dissipation=125mW, Min Operating Temperature=-55°C, Package Quantity=10, Resistance=1kR, Resistance Tolerance=1%, Resistor Type="Thick Film", Supplier Part Number 1=541-1.00KYCT-ND, Temperature Coefficient=100ppm/°C, Voltage Rating=50V, Case/Package=0402, ComponentLink1Description=http://www.farnell.com/datasheets/2339608.pdf?src-supplier=Element14, ComponentLink1URL=http://www.farnell.com/datasheets/2339608.pdf?src-supplier=Element14, ComponentLink2Description=http://www.vishay.com/docs/20043/crcwhpe3.pdf?src-supplier=Digi-Key, ComponentLink2URL=http://www.vishay.com/docs/20043/crcwhpe3.pdf?src-supplier=Digi-Key, ComponentLink3Description=http://www.mouser.com/ds/2/427/crcwhpe3-46056.pdf?src-supplier=Mouser, ComponentLink3URL=http://www.mouser.com/ds/2/427/crcwhpe3-46056.pdf?src-supplier=Mouser, ComponentLink4Description=http://www.vishay.com/docs/20043/crcwhpe3.pdf?src-supplier=Avnet, ComponentLink4URL=http://www.vishay.com/docs/20043/crcwhpe3.pdf?src-supplier=Avnet, ComponentLink5Description=http://www.vishay.com/docs/20043/crcwhpe3.pdf?src-supplier=Future+Electronics, ComponentLink5URL=http://www.vishay.com/docs/20043/crcwhpe3.pdf?src-supplier=Future+Electronics, Construction=Rectangular, Contact Plating=Tin, Depth=0.5mm, Features="Automotive AEC-Q200", Height=0.3mm, Lead Free="Lead Free", Length=1mm, Manufacturer Part Number=CRCW04021K00FKEDHP, Military Standard=Not, Mount="Surface Mount", Number of Pins=2, Number of Terminations=2, Packaging="Tape and Reel", Power Rating=125mW, Pricing 1="1=0.15, 10=0.132, 100=0.0506, 1000=0.02226, 2500=0.01923, 5000=0.0172 (USD)", Radiation Hardening=No, REACH SVHC=Unknown, RoHS Compliant=Yes, Series=CRCW-HP, Size Code=0402, Stock 1=315989, Supplier 1=Digi-Key, Technology="THICK FILM", Termination=SMD/SMT, Tolerance=1%, Voltage Rating (DC)=50V, Weight=2.3E-05oz, Width=0.5mm
R6: library part RT0402BRD0710KL, "RES SMD 10K OHM 0.1% 1/16W 0402", LCSC Part Number=C190095, Manufacturer=Yageo, Supplier Part Number=1236728, Category="Chip SMD Resistors", ComponentLink1Description=https://datasheet.ciiva.com/12836/pyu-rt-1-to-0-05-rohs-l-4-12836454.pdf?src-supplier=Mouser, ComponentLink1URL=https://datasheet.ciiva.com/12836/pyu-rt-1-to-0-05-rohs-l-4-12836454.pdf?src-supplier=Mouser, Item Type=Resistor, Manufacturer Part Number=RT0402BRD0710KL, Pricing="10000=0.0218, 20000=0.0213, 30000=0.021, 50000=0.0206, 100000=0.0199 (USD)", RoHS=Yes, Stock=490000, Supplier="Future Electronics"
R7: library part RC0402FR-073K3L, "RES 3.3K OHM 1% 1/16W 0402", Case Code (Imperial)=0402, Case Code (Metric)=1005, LCSC Part Number=C137992, Manufacturer=Yageo, Max Operating Temperature=155°C, Max Power Dissipation=63mW, Min Operating Temperature=-55°C, Package Quantity=1, Power Rating=62.5mW, Resistance=3.3kR, Resistance Tolerance=1%, Resistor Type="Thick Film", Supplier Part Number 1=603-RC0402FR-073K3L, Temperature Coefficient=100ppm/°C, Voltage Rating=50V, Case/Package=0402, Category="Chip SMD Resistors", ComponentLink1Description=https://datasheet.ciiva.com/11808/0900766b80c66297-11808441.pdf?src-supplier=RSComponents, ComponentLink1URL=https://datasheet.ciiva.com/11808/0900766b80c66297-11808441.pdf?src-supplier=RSComponents, ComponentLink2Description=https://datasheet.ciiva.com/46394/1018594-46394940.pdf?src-supplier=Element14, ComponentLink2URL=https://datasheet.ciiva.com/46394/1018594-46394940.pdf?src-supplier=Element14, ComponentLink3Description=https://datasheet.ciiva.com/2453/pyu-r-int-thick-7-2453395.pdf?src-supplier=Digi-Key, ComponentLink3URL=https://datasheet.ciiva.com/2453/pyu-r-int-thick-7-2453395.pdf?src-supplier=Digi-Key, ComponentLink4Description=https://datasheet.ciiva.com/2453/pyu-r-int-thick-7-2453396.pdf?src-supplier=Digi-Key, ComponentLink4URL=https://datasheet.ciiva.com/2453/pyu-r-int-thick-7-2453396.pdf?src-supplier=Digi-Key, ComponentLink5Description=https://datasheet.ciiva.com/2453/pyu-r-int-thick-7-2453394.pdf?src-supplier=Digi-Key, ComponentLink5URL=https://datasheet.ciiva.com/2453/pyu-r-int-thick-7-2453394.pdf?src-supplier=Digi-Key, ComponentLink6Description=https://datasheet.ciiva.com/16746/pyu-rc0402-51-rohs-l-6-r-16746361.pdf?src-supplier=Future+Electronics, ComponentLink6URL=https://datasheet.ciiva.com/16746/pyu-rc0402-51-rohs-l-6-r-16746361.pdf?src-supplier=Future+Electronics, Construction=Rectangular, Depth=0.5mm, Features="Moisture Resistant", Height=0.016inch, Item Type=Resistor, Lead Free="Lead Free", Length=1mm, Manufacturer Part Number=RC0402FR-073K3L, Military Standard=Not, Number of Pins=2, Number of Terminations=2, Packaging="Tape and Reel", Pricing 1="1=0.10000, 10=0.01400, 50=0.01400, 100=0.00600, 1000=0.00300, 5000=0.00200, 10000=0.00100 (USD)", REACH SVHC="No SVHC", RoHS=Yes, RoHS Compliant=Yes, Series=RC, Size Code=0402, Stock 1=2413047, Supplier 1=Mouser, Technology="THICK FILM", Termination=SMD/SMT, Tolerance=1%, Voltage Rating (DC)=50V, Width=0.5mm
SW1 SW2 SW3 SW4: "SWITCH TACTILE SPST-NO 0.05A 12V", Contact Current Rating=50mA, Contact Resistance=100mR, Insulation Resistance=100MR, LCSC Part Number=C231329, Manufacturer=Omron, Max Operating Temperature=70°C, Max Voltage Rating (DC)=12V, Min Operating Temperature=-25°C, Operating Force=1.5N, Package Quantity=1, Ratings="Dust Proof,IP40", Supplier Part Number 1=SW1020DKR-ND, Actuator Length=0.4mm, Actuator Type=Standard, ComponentLink1Description=http://www.farnell.com/datasheets/60838.pdf?src-supplier=Farnell, ComponentLink1URL=http://www.farnell.com/datasheets/60838.pdf?src-supplier=Farnell, ComponentLink2Description=http://www.farnell.com/datasheets/60838.pdf?src-supplier=Element14, ComponentLink2URL=http://www.farnell.com/datasheets/60838.pdf?src-supplier=Element14, ComponentLink3Description=https://omronfs.omron.com/en_US/ecb/products/pdf/en-b3u.pdf?src-supplier=Digi-Key, ComponentLink3URL=https://omronfs.omron.com/en_US/ecb/products/pdf/en-b3u.pdf?src-supplier=Digi-Key, ComponentLink4Description=http://www.omron.com/ecb/products/pdf/en-b3u.pdf?src-supplier=Digi-Key, ComponentLink4URL=http://www.omron.com/ecb/products/pdf/en-b3u.pdf?src-supplier=Digi-Key, ComponentLink5Description=https://www.distrelec.biz/Web/Downloads/he/et/B3U_eng_datasheet.pdf?mime=application%2Fpdf&src-supplier=Distrelec, ComponentLink5URL=https://www.distrelec.biz/Web/Downloads/he/et/B3U_eng_datasheet.pdf?mime=application%2Fpdf&src-supplier=Distrelec, ComponentLink6Description=http://www.onlinecomponents.com/productFiles/mf-OM/en-b3u.pdf?src-supplier=Onlinecomponents.com, ComponentLink6URL=http://www.onlinecomponents.com/productFiles/mf-OM/en-b3u.pdf?src-supplier=Onlinecomponents.com, ComponentLink7Description=https://www.verical.com/server-webapp/html/getDatasheet?partID=552554&src-supplier=Verical, ComponentLink7URL=https://www.verical.com/server-webapp/html/getDatasheet?partID=552554&src-supplier=Verical, ComponentLink8Description=http://www.farnell.com/datasheets/1685550.pdf?src-supplier=Element14, ComponentLink8URL=http://www.farnell.com/datasheets/1685550.pdf?src-supplier=Element14, ComponentLink9Description=http://www.farnell.com/datasheets/2610940.pdf?src-supplier=Farnell, ComponentLink9URL=http://www.farnell.com/datasheets/2610940.pdf?src-supplier=Farnell, ComponentLink10Description=https://www.alliedelec.com/m/d/4c8a9ef82804fc3c241a13c1e298fd73.pdf?src-supplier=Allied+Electronics, ComponentLink10URL=https://www.alliedelec.com/m/d/4c8a9ef82804fc3c241a13c1e298fd73.pdf?src-supplier=Allied+Electronics, Contact Material=Silver, Current Rating=50mA, Depth=2.5mm, Electrical Life=200000Cycles, Height=1.2mm, Illumination Type=Non-Illuminated,Illuminated, Item Type=Switch, Lead Free="Lead Free", Length=4mm, Manufacturer Part Number=B3U-1000P, Max Current Rating=50mA, Mechanical Life=200000Cycles, Mount="Surface Mount", Orientation=Straight, Packaging="Tape and Reel", Pricing 1="1=1, 10=0.961, 25=0.9064, 50=0.7976, 100=0.7251, 250=0.68888, 500=0.67074, 1000=0.52571 (USD)", REACH SVHC=Unknown, Stock 1=116454, Supplier 1=Digi-Key, Switch Function=Off-Mom, Switch Travel=0.15mm, Termination=SMD/SMT, Throw Configuration=SPST, Voltage Rating (DC)=12V, Weight=0.000776oz, Width=3mm
U1: "SOT-23-6 RF Transceiver ICs ROHS", LCSC Part Number=C2886627, Manufacturer=WF, Package=SOT-23-6, ComponentLink1Description=LCSC, ComponentLink1URL=https://www.lcsc.com/product-detail/RF-Transceiver-ICs_WF-WF4455TD-AS6T-LG_C2886627.html, Item Type=IC, Manufacturer Part Number="WF4455TD AS6T LG"
U2: "SOP-8 Interface - Specialized ROHS", LCSC Part Number=C3038668, Manufacturer=WL, Package=SOP-8, ComponentLink1Description=LCSC, Item Type=IC, Manufacturer Part Number=L1527
X1: library part "13.560M 20PF 10PPM", "13.56MHz null ±10ppm HC-49S-SMD-2P-Mini Crystals ROHS", LCSC Part Number=C2975362, Manufacturer=SST, Package=HC-49S-SMD-2P-Mini, ComponentLink1Description=LCSC, Item Type=Crystal, Manufacturer Part Number="13.560M 20PF 10PPM"

## Free pads (board coordinates)
  round 0 hole 92.52 unplated: MH(0,0) MH(0,704) MH(1107,1) MH(1107,1191)

## Via types
v1: diameter 23.62, hole 11.81, Top Layer to Bottom Layer, tented both sides, 142 vias

## Nets (pads, with @x,y where several pads share a name; then routed paths per layer and width w, separated by ;. In a path a pad name is that pad's centre, name@x,y a point inside that pad or via, vN(x,y) a via of type N, cw(c..) or ccw(c..) an arc to the next point about the centre after c; other vN are vias at no path point)
3.3V: C3.2 C5.2 C7.2 J1.1 L2.2 R1.2 R2.2 R4.1 R5.2 U2.2 | length 3583.4
  Top Layer w25: v1(102,1223) 102,1083.92 cw(c47.14,1083.92) 85.93,1045.13 cw(c18.56,1112.5) 18.56,1017.22 v1(-20.78,1017.22) ccw(c49.76,1087.76) 49.76,988 v1@328,988
  Top Layer w50: J1.1@148.3,357.13 148.3,528.88 cw(c248.3,528.88) 177.59,599.59 298.71,720.71 ccw(c228,791.42) 328,791.42 v1(328,985)
  Bottom Layer w15: R4.1 C7.2 ; U2.2 U2.2@889.72,915.9
  Bottom Layer w20: v1(-20.78,1017.22) L2.2 ; R1.2 C3.2 v1@101.97,1222.97
  Bottom Layer w25: v1(328,985) 467.96,985 ccw(c467.96,1043.04) 509,1002 ccw(c460.2,1050.8) 529.21,1050.8 R5.2
  Bottom Layer w40: U2.2@889.72,915.9 cw(c889.72,837.72) 945,893 cw(c910.41,858.41) 959.33,858.41 959.33,357.13 J1.1@959.33,344.13
  Bottom Layer w50: J1.1@148.3,344.13 148.3,262.12 ccw(c248.3,262.12) 177.59,191.41 205.71,163.29 ccw(c276.42,234) 276.42,134 854.58,134 ccw(c854.58,234) 925.29,163.29 946,184 ccw(c913.82,216.18) 959.33,216.18 J1.1@959.33,344.13
Antenna: ANT1.1 L3.1 | length 415.2
  Bottom Layer w30: 48.13,1188.7 ANT1.1@48.13,1603.87
DAT: R6.1 R7.2 U2.4 | length 445.2
  Bottom Layer w15: R7.2 561.79,1187 ccw(c583,1187) 568,1172 ccw(c589.73,1193.73) 589.73,1163 715.58,1163 cw(c715.58,1063) 786.29,1133.71 787,1133 cw(c731.47,1077.47) 810,1077.47 R6.1 ; R6.1@810.1,1015.9 U2.4
DIN: R3.1 R6.2 U1.4 | length 743.8
  Top Layer w20: v1(262.57,1090.72) 371.53,1090.72 cw(c371.53,1057.53) 395,1081 cw(c373.27,1059.27) 404,1059.27 v1(404,949)
  Bottom Layer w20: U1.4@209.24,1057.93 R3.1@260.57,1057.93 ; R3.1 v1(262.57,1090.72) ; v1(404,949) 477.17,949 ccw(c477.17,1004.12) 516.14,965.14 539,988 cw(c606.6,920.4) 606.6,1016 R6.2
GND: C1.2 C2.2 C3.1 C5.1 C7.1 J1.2 LED1.2 R3.2 U1.2 U2.3 | length 1052.5
  Top Layer w20: LED1.2 v1(625,1209)
  Bottom Layer w15: C7.1 859.55,968 cw(c859.55,960.82) U2.3
  Bottom Layer w20: C1.2 v1(-30,940.79) ; U1.2@116.5,1019.93 v1(151.29,1019.93) ; v1(262.57,947.14) C5.1 ; R3.2 v1(332.36,1057.93) ; C2.2@350,907.5 v1(383.79,907.5)
  Bottom Layer w50: J1.2 553.57,897.69 553.53,910.77 cw(c633,910.81) 557.48,935.54 559.81,940.04 cw(c604.19,917) 604.19,967 732,967 732,966
  other v1: 73.95,-6.48 152.69,-6.48 231.43,-6.48 310.17,-6.48 388.91,-6.48 467.65,-6.48 546.39,-6.48 625.13,-6.48 703.87,-6.48 782.61,-6.48 861.35,-6.48 940.09,-6.48 1018.83,-6.48 34.58,72.26 113.32,72.26 192.06,72.26 270.8,72.26 349.54,72.26 428.28,72.26 585.76,72.26 664.5,72.26 743.24,72.26 821.98,72.26 900.72,72.26 979.46,72.26 1058.2,72.26 1136.94,72.26 -4.79,151 73.95,151 152.69,151 1018.83,151 1097.57,151 34.58,229.74 270.8,229.74 349.54,229.74 428.28,229.74 743.24,229.74 821.98,229.74 900.72,229.74 1058.2,229.74 1136.94,229.74 -4.79,308.48 73.95,308.48 231.43,308.48 310.17,308.48 388.91,308.48 782.61,308.48 861.35,308.48 1018.83,308.48 1097.57,308.48 34.58,387.22 270.8,387.22 349.54,387.22 743.24,387.22 821.98,387.22 900.72,387.22 1058.2,387.22 1136.94,387.22 -4.79,465.96 73.95,465.96 231.43,465.96 310.17,465.96 388.91,465.96 782.61,465.96 861.35,465.96 1018.83,465.96 1097.57,465.96 34.58,544.7 270.8,544.7 349.54,544.7 428.28,544.7 664.5,544.7 743.24,544.7 821.98,544.7 900.72,544.7 1058.2,544.7 1136.94,544.7 -4.79,623.44 73.95,623.44 310.17,623.44 388.91,623.44 625.13,623.44 782.61,623.44 861.35,623.44 1018.83,623.44 1097.57,623.44 113.32,702.18 192.06,702.18 349.54,702.18 428.28,702.18 743.24,702.18 821.98,702.18 900.72,702.18 1058.2,702.18 1136.94,702.18 -4.79,780.92 73.95,780.92 152.69,780.92 231.43,780.92 388.91,780.92 782.61,780.92 861.35,780.92 1018.83,780.92 1097.57,780.92 428.28,859.66 73.95,938.4 231.43,938.4 979.46,1017.14 -4.79,1095.88 231.43,1095.88 861.35,1095.88 940.09,1095.88 1018.83,1095.88 1097.57,1095.88 -4,1128 -3.21,1160.12 192.06,1174.62 270.8,1174.62 349.54,1174.62 428.28,1174.62 821.98,1174.62 900.72,1174.62 979.46,1174.62 -2.41,1192.23 -1.62,1224.35
NetC1_1: C1.1 U1.1 X1.1 | length 282.1
  Bottom Layer w10: X1.1@69.95,870 ccw(c69.95,871.55) 71.05,870.45 X1.1@107.5,870.45
  Bottom Layer w12: U1.1@110.14,982.53 cw(c110.14,950) 133.14,973 cw(c118.66,958.51) 139.14,958.51 139.14,897.31 cw(c111.83,897.31) 131.14,878 cw(c112.93,896.22) X1.1@112.93,870.45
  Bottom Layer w15: C1.1 X1.1@69.95,870
NetC2_1: C2.1 U1.6 X1.2 | length 254.1
  Bottom Layer w12: U1.6@195,982.53 U1.6@208,982.53 ; X1.2@205.22,870.45 cw(c205.22,896.22) 187,878 cw(c206.31,897.31) 179,897.31 179,958.51 cw(c199.49,958.51) 185,973 cw(c208,950) U1.6@208,982.53 ; U1.6 U1.6@208,982.53
  Bottom Layer w15: X1.2 C2.1@348.95,870.45
NetC4_1: C4.1 L3.2
NetL1_2: L1.2 R1.1 | length 44.1
  Bottom Layer w20: L1.2 134.75,1140.75 cw(c149.16,1140.75) R1.1
NetLED1_1: LED1.1 R7.1 | length 66.8
  Top Layer w15: v1(488,1209) LED1.1 ccw(c512.53,1206.59) LED1.1@512.53,1210
  Bottom Layer w15: v1(488,1209) 521.57,1209 ccw(c521.57,1213.55) R7.1@524.79,1210.33
NetR2_1: R2.1 U1.5 | length 51.3
  Bottom Layer w20: U1.5@209.24,1020.53 R2.1@260.57,1020.53
NetR4_2: R4.2 U2.1 | length 65
  Bottom Layer w15: R4.2 852.8,861 ccw(c852.8,877.72) U2.1
PAOUT: C4.2 L1.1 L2.1 U1.3 | length 97.5
  Bottom Layer w20: L2.1@10,1057.33 U1.3
SW1: SW1.1 U2.8 | length 1271
  Top Layer w15: SW1.1 620,159.58 cw(c720,159.58) 649.29,230.29 678,259 ccw(c615.23,321.77) 704,321.77 704,815.37 cw(c758.63,815.37) 720,854 cw(c748.72,825.28) 748.72,865.9 v1(1138.9,865.9)
  Bottom Layer w15: U2.8 v1(1138.9,865.9)
SW2: SW2.1 U2.7 | length 1021.9
  Top Layer w15: SW2.1 620,532.72 cw(c688.28,532.72) 640,581 ccw(c586.89,634.11) 662,634.11 662,838.64 cw(c747.36,838.64) 687,899 cw(c727.79,858.21) 727.79,915.9 v1(1138.9,915.9)
  Bottom Layer w15: U2.7 v1(1138.9,915.9)
SW3: SW3.1 U2.6 | length 793.2
  Top Layer w15: SW3.1 620,907.96 cw(c678.04,907.96) 637,949 cw(c677.79,908.21) 677.79,965.9 v1(1138.9,965.9)
  Bottom Layer w15: U2.6 v1(1138.9,965.9)
SW4: SW4.1 U2.5 | length 610.8
  Top Layer w15: SW4.1 ccw(c667.75,1039.78) 633.99,1006.01 ccw(c670.23,1042.26) 670.23,991 1078.79,991 ccw(c1078.79,1076) v1(1138.9,1015.9)
  Bottom Layer w15: U2.5 v1(1138.9,1015.9)
SW_VDD: R5.1 SW1.2 SW2.2 SW3.2 SW4.2 | length 1171.8
  Top Layer w35: SW1.2 SW4.2 486.14,1095.37 cw(c526.63,1095.37) 498,1124 cw(c525.05,1096.95) 525.05,1135.21 v1(599.8,1135.21)
  Bottom Layer w20: R5.1 v1(599.8,1135.21)

## Polygon pours and split planes (outlines as drawn)
GND on Top Layer "NONET_L-01_P-001" (solid, remove dead copper, pour order 7): 77.03,1022.44 19.03,1022.44 19.03,1250.03 -58.74,1250.03 -58.97,1249.81 -58.97,-58.51 77.03,-58.51 1166.03,-58.51 1166.03,1250.16 77.03,1250.16
GND on Bottom Layer "NONET_L-01_P-001" (solid, remove dead copper, pour order 0): 77,1022.41 19,1022.41 19,1250 -58.78,1250 -59,1249.78 -59,-58.54 77,-58.54 1166,-58.54 1166,1250.13 77,1250.13

## Other copper
Bottom Layer:
  rectangle net 3.3V: 289,975.33 317,1033.5
  region net PAOUT: 119.32,1119.75 94.97,1119.75 94.97,1057.33 119.32,1057.33
  region net NetC4_1: 63.27,1144.4 33.27,1144.4 33.27,1085.37 63.27,1085.37
  rectangle net GND: 724.71,945 890.21,990.1
  rectangle net 3.3V: 788.41,891 897,938
  rectangle net Antenna: 33,1151 63,1186
  region net 3.3V: 344,967 344,1003 289,1003 289,967

## Silkscreen, mask and mechanical layers (free items; w line width, h text height)
Top Overlay:
  text "DIN" at 498.69,1130 h55
Board Outline:
  lines w10: 1166,1486.73 1166,-58.54 -59,-58.54 -59,1715 218,1715 218,1487 1166,1487
Fabrication:
  drawing of 191 lines, arcs and shapes, not listed
  text "Antenna (ANT) Should be mounted at a height" at -271,1827.34 h80
  text "of 3mm as per recommendation of Datasheet." at -273,1749.81 h80
  text "Layer" at 1557.09,1588 h60
  text "Name" at 1967,1588 h60
  text "Material" at 2896.74,1588 h60
  text "Thickness" at 3756.51,1588 h60
  text "Constant" at 4406.35,1588 h60
  text "Board Layer Stack" at 4976.21,1588 h60
  text "Top Overlay" at 1967,1468 h60
  text "Top Solder" at 1967,1348 h60
  text "Solder Resist" at 2896.74,1348 h60
  text "3.00mil" at 3756.51,1348 h60
  text "3.5" at 4406.35,1348 h60
  text "1" at 1557.09,1228 h60
  text "Top Layer" at 1967,1228 h60
  text "10.00mil" at 3756.51,1228 h60
  text "Dielectric 1" at 1967,1108 h60
  text "FR-4" at 2896.74,1108 h60
  text "37.00mil" at 3756.51,1108 h60
  text "4.8" at 4406.35,1108 h60
  text "2" at 1557.09,988 h60
  text "Bottom Layer" at 1967,988 h60
  text "10.00mil" at 3756.51,988 h60
  text "Bottom Solder" at 1967,868 h60
  text "Solder Resist" at 2896.74,868 h60
  text "3.00mil" at 3756.51,868 h60
  text "3.5" at 4406.35,868 h60
  text "Bottom Overlay" at 1967,748 h60
  text "Total board thickness:" at 1557.09,628 h60
  text "63.00mil" at 3756.51,628 h60
Drill Drawing:
  circle w10: c-136.38,2700.28 r33.33
  lines w10: -169.71,2383.61 -153.04,2383.61 -136.38,2366.94 -119.71,2383.61 -103.04,2383.61 -119.71,2400.28 -103.04,2416.94 -119.71,2416.94 -136.38,2433.61 -153.04,2416.94 -169.71,2416.94 -153.04,2400.28 -169.71,2383.61 ; -169.71,2516.94 -103.04,2516.94 -103.04,2583.61 -169.71,2583.61 -169.71,2516.94 ; -169.71,2883.61 -103.04,2883.61 -136.38,2816.94 -169.71,2883.61
  lines w15: -229.5,2321.94 7470.38,2321.94 ; -229.5,2921.94 7470.38,2921.94 ; 321.38,2171.94 321.38,3071.94 ; 911.22,2171.94 911.22,3071.94 ; 2010.9,2171.94 2010.9,3071.94 ; 2516.78,2171.94 2516.78,3071.94 ; 3250.58,2171.94 3250.58,3071.94 ; 4750.13,2171.94 4750.13,3071.94 ; 5339.98,2171.94 5339.98,3071.94 ; 6085.78,2171.94 6085.78,3071.94 ; -229.5,2171.94 7470.38,2171.94 7470.38,3071.94 -229.5,3071.94 -229.5,2171.94
  text "Symbol" at -139.5,2966.94 h72
  text "Count" at 366.38,2966.94 h72
  text "Hole Size" at 956.22,2966.94 h72
  text "Plated" at 2055.9,2966.94 h72
  text "Hole Type" at 2561.78,2966.94 h72
  text "Drill Layer Pair" at 3295.58,2966.94 h72
  text "Via/Pad" at 4795.13,2966.94 h72
  text "Pad Shape" at 5384.98,2966.94 h72
  text "Template" at 6130.78,2966.94 h72
  text "142" at 366.38,2816.94 h60
  text "11.81mil (0.300mm)" at 956.22,2816.94 h60
  text "PTH" at 2055.9,2816.94 h60
  text "Round" at 2561.78,2816.94 h60
  text "Top Layer - Bottom Layer" at 3295.58,2816.94 h60
  text "Via" at 4795.13,2816.94 h60
  text "Rounded" at 5384.98,2816.94 h60
  text "(Mixed)" at 6130.78,2816.94 h60
  text "2" at 366.38,2666.94 h60
  text "35.43mil (0.900mm)" at 956.22,2666.94 h60
  text "PTH" at 2055.9,2666.94 h60
  text "Slot" at 2561.78,2666.94 h60
  text "Top Layer - Bottom Layer" at 3295.58,2666.94 h60
  text "Pad" at 4795.13,2666.94 h60
  text "Rounded" at 5384.98,2666.94 h60
  text "r180_350h90_250r100" at 6130.78,2666.94 h60
  text "1" at 366.38,2516.94 h60
  text "62.99mil (1.600mm)" at 956.22,2516.94 h60
  text "PTH" at 2055.9,2516.94 h60
  text "Round" at 2561.78,2516.94 h60
  text "Top Layer - Bottom Layer" at 3295.58,2516.94 h60
  text "Pad" at 4795.13,2516.94 h60
  text "Rounded" at 5384.98,2516.94 h60
  text "c250h160m255mx255p250" at 6130.78,2516.94 h60
  text "4" at 366.38,2366.94 h60
  text "92.52mil (2.350mm)" at 956.22,2366.94 h60
  text "NPTH" at 2055.9,2366.94 h60
  text "Round" at 2561.78,2366.94 h60
  text "Top Layer - Bottom Layer" at 3295.58,2366.94 h60
  text "Pad" at 4795.13,2366.94 h60
  text "Rounded" at 5384.98,2366.94 h60
  text "c0hn235" at 6130.78,2366.94 h60
  text "149 Total" at 366.38,2216.94 h60
  text "Slot definitions :" at -139.5,2071.97 h60
  text "Routed Path Length" at 893.19,2071.97 h60
  text "= Calculated from tool start centre position to tool end centre position." at 1995.86,2071.97 h60
  text "Hole Length" at 893.19,1971.99 h60
  text "= Routed Path Length + Tool Size = Slot length as defined in the PCB layout" at 1585.99,1971.99 h60

## Dimensions
-59,1715 to -59,-58.54 on Dimensions
1166,-58.54 to -59,-58.54 on Dimensions